# Altium PCB PCB1.PcbDoc (part 4 of 4)
Units mm, origin at the board's own origin, x right, y up, seen from the top; angles counter-clockwise.
Board outline 159.38 x 83.25 mm, 8 copper layers (Top Layer 1, GND, Signal 1, Signal 2, Power, Signal 3, Signal 4, Bottom Layer), stack 1.998 mm thick; 345 components, 291 nets, 1244 pads, 614 vias.
Unrouted connection lines stored in the file: 12.
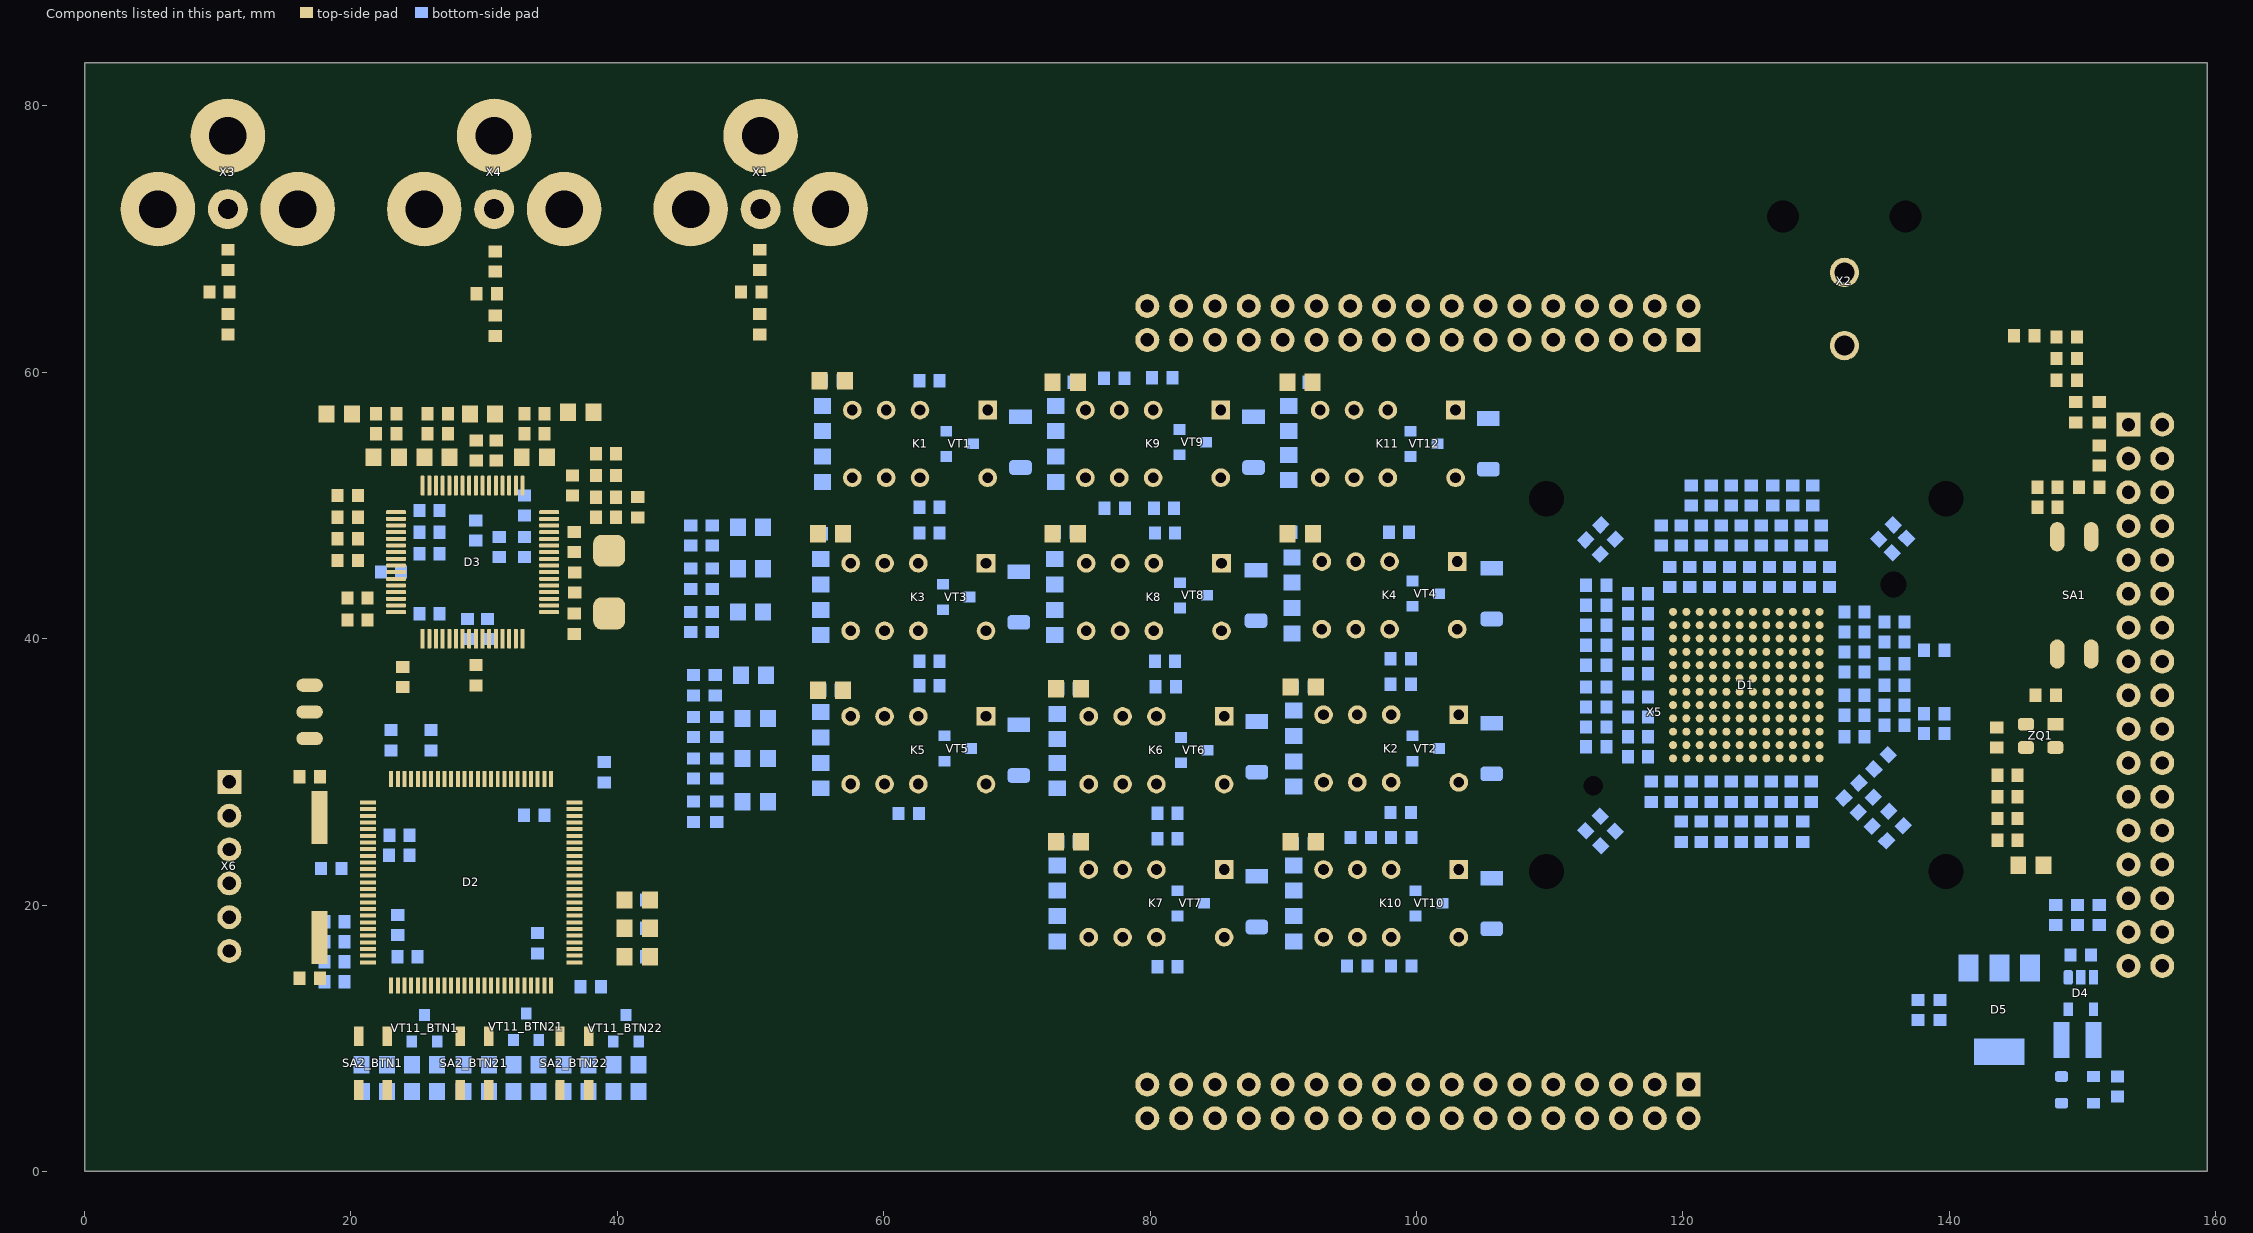
[diagram p10: the components of this part, seen from the top]

## Polygon pours and split planes (outlines as drawn) (continued)
+1.8V_VADD on Power "NONET_L-01_P-001" (solid, remove dead copper, pour order 15): 47.25,47.75 42.625,47.75 39,51.375 31.875,51.375 30.703,50.203 30.703,48.953 30.125,48.375 28.875,48.375 28.375,48.875 28.375,52.25 29.32,53.195 45.68,53.195 48,50.875 48,48.5
GND on Top Layer 1 "NONET_L-01_P-001" (solid, remove dead copper, pour order 31): 1,82.25 1,1 158.375,1 158.375,82.25
GND on GND "NONET_L-01_P-001" (solid, remove dead copper, pour order 32): 1,82.254 1,1 158.375,1 158.375,82.254

## Other copper
Top Layer 1:
  pour cut-out: 39.5,23.533 40.967,23.533 41.25,23.25
  pour cut-out: 29.018,31.176 27.926,31.176 27.375,30.625
  pour cut-out: 30.719,32.877 29.018,31.176 29.018,30.75
  pour cut-out: 144.425,23.8 144.425,22.2 147.825,22.2 147.825,23.8 146.898,23.8
  pour cut-out: 135.806,42.582 134.25,42.582 134.25,43.409
  pour cut-out: 135.806,45.546 134.25,45.546 134.25,44.469
  pour cut-out: 31.141,27.829 32.018,27.829 32.018,28.107
  pour cut-out: 30.733,28.237 30.733,28.852 31.018,28.852
  pour cut-out: 144.265,62.1 144.265,63.406 147.394,63.406 147.394,62.094
  pour cut-out: 155.986,54.641 151.25,54.641 151.25,53.75
  pour cut-out: 150.594,55.584 150.594,50.992 153.446,50.992
  pour cut-out: 154.593,48.579 154.593,50.992 153.446,50.992
  pour cut-out: 155.986,49.883 153.446,49.883 153.446,50.992
  pour cut-out: 157.095,53.532 157.095,50.992 155.986,50.992
  pour cut-out: 147.535,52.025 153.446,52.025 153.446,49.225 147.535,49.225
  pour cut-out: 139.721,10.162 139.721,9.411 139.313,9.411
  pour cut-out: 138.905,10.162 138.905,9.411 139.313,9.411
  pour cut-out: 138.057,10.181 138.057,9.382 137.649,9.382
  pour cut-out: 137.241,10.181 137.241,9.382 137.649,9.382
  pour cut-out: 141.125,11.842 146.75,11.842 146.75,12.658
  pour cut-out: 141.125,12.658 146.75,12.658 146.75,12.25
  pour cut-out: 113.158,30.625 113.158,29.875 112.875,29.875
  pour cut-out: 112.342,30.625 112.342,29.625 112.625,29.625
  pour cut-out: 126.283,23.614 126.283,22.875 125.875,22.875
  pour cut-out: 125.467,23.614 125.467,22.875 125.875,22.875
  pour cut-out: 124.783,23.619 124.783,22.875 124.375,22.875
  pour cut-out: 123.967,23.619 123.967,22.875 124.375,22.875
  pour cut-out: 123.283,23.625 123.283,22.875 122.875,22.875
  pour cut-out: 122.467,23.625 122.467,22.875 122.875,22.875
  pour cut-out: 137.464,28.462 136.823,28.462 136.823,27.821
  pour cut-out: 136.246,28.398 136.887,28.398 136.887,29.038
  pour cut-out: 134.043,32.625 134.043,31.817 133.56,31.817
  pour cut-out: 133.227,32.625 133.227,31.817 133.56,31.817
  pour cut-out: 137.043,35 137.043,35.75 136.623,35.75
  pour cut-out: 136.227,35 136.227,35.75 136.623,35.75
  pour cut-out: 135.523,36.5 135.523,35 135.115,35
  pour cut-out: 134.707,36.5 134.707,35 135.115,35
  pour cut-out: 133.635,42.408 134.25,42.408 134.25,42.251
  pour cut-out: 133.227,42 133.227,40.5 133.635,40.5
  pour cut-out: 99.978,26.951 99.978,25.072 99.615,25.072
  pour cut-out: 28.408,12.75 28.408,13.352 28.168,13.352
  pour cut-out: 28.408,12.75 28.408,11.625 28.053,11.625
  pour cut-out: 26.018,31.015 27.375,31.015 27.375,30.625
  pour cut-out: 22.75,26.842 21.868,26.842 21.868,27.052
  pour cut-out: 22.75,27.658 21.624,27.658 21.624,27.352
  pour cut-out: 18.401,24.75 18.401,19.717 16.901,19.717
  pour cut-out: 16.901,24.824 16.901,19.717 18.401,19.717
  pour cut-out: 19.122,18.75 19.122,14.25 19.53,14.25
  pour cut-out: 22.018,18.502 19.53,18.502 19.53,18.169
  pour cut-out: 27,22.283 22.57,22.283 22.57,21.875
  pour cut-out: 22.908,22.75 22.908,21.875 22.57,21.875
  pour cut-out: 33.816,30.202 37.299,30.202 37.299,29.934
  pour cut-out: 44.408,31 44.408,31.625 44.102,31.625
  pour cut-out: 41,30.592 44,30.592 44,31
  pour cut-out: 40.592,31 40.592,31.625 40.873,31.625
  pour cut-out: 41.7,21.175 43.2,21.175 43.2,15.325 41.7,15.325
  pour cut-out: 38.408,15.25 38.408,18.226 38.226,18.226
  pour cut-out: 36.36,13.952 36.36,15.402 36.018,15.402
  pour cut-out: 34.718,14.702 34.718,15.402 36.018,15.402
  pour cut-out: 34.324,14.881 34.75,14.881 34.75,15.125
  pour cut-out: 35.839,27.008 35.839,27.5 35.625,27.5
  pour cut-out: 38.283,28.375 38.283,30.436 37.686,30.436
  pour cut-out: 36.339,27.402 35.303,27.402 35.303,27.621
  pour cut-out: 32.875,31.033 34.5,31.033 34.5,30.625
  pour cut-out: 27.783,31.375 27.783,29.816 27.368,29.816
  pour cut-out: 26.018,31.015 24.75,31.015 24.75,30.828
  pour cut-out: 25.158,32 25.158,30.052 24.518,30.052
  pour cut-out: 41.217,37.75 41.217,39.5 41.934,39.5
  pour cut-out: 44.408,38.75 44.408,39.5 44.083,39.5
  pour cut-out: 44.877,37.156 44.408,37.156 44.408,38.75
  pour cut-out: 42.406,36.623 44.5,36.623 44.5,37
  pour cut-out: 41.625,37.342 41.842,37.342 41.842,37
  pour cut-out: 41.342,38.75 41.342,37.75 41.217,37.75
  pour cut-out: 41.342,38.75 41.342,39.5 41.535,39.5
  pour cut-out: 43.408,45 43.408,46.75 43,46.75
  pour cut-out: 42.592,46.75 42.592,45 43,45
  pour cut-out: 23.225,38.485 24.525,38.485 24.525,35.765 23.225,35.765
  pour cut-out: 35.286,50.128 35.286,49.644 35.141,49.644
  pour cut-out: 35.255,50.284 35.255,51.745 34.87,51.745
  pour cut-out: 36.375,49.431 35.606,49.431 35.606,49.122
  pour cut-out: 19.13,43.703 21.85,43.703 21.85,40.752
  pour cut-out: 19.13,43.703 19.13,40.752 21.85,40.752
  pour cut-out: 24.141,49.781 25.074,49.781 25.074,51.24
  pour cut-out: 33.125,51.625 34.3,51.625 34.3,51.175
  pour cut-out: 35.553,41.69 36.625,41.69 36.625,42
  pour cut-out: 31.666,37.284 31.666,38.337 30.587,38.337
  pour cut-out: 32.658,37 32.658,37.625 32.5,37.625
  pour cut-out: 30.467,38.625 30.467,39.478 30.728,39.478
  pour cut-out: 30.035,35.89 30.035,38.46 28.885,38.46
  pour cut-out: 28.735,35.89 28.735,39.319 29.682,39.319
  pour cut-out: 28.953,39.09 26.878,39.09 26.878,39.994
  pour cut-out: 25.074,40.669 25.074,41.75 25.25,41.75
  pour cut-out: 24.053,41.69 25.125,41.69 25.125,41.875
  pour cut-out: 26.506,40.722 26.115,40.722 26.115,40.831
  pour cut-out: 29.748,40.744 30.072,40.744 30.072,41.116
  pour cut-out: 34.115,45.707 34.115,45.3 33.851,45.3
  pour cut-out: 32.491,50.653 31.953,50.653 31.953,50.59
  pour cut-out: 25.125,45.967 25.72,45.967 25.72,46.033
  pour cut-out: 25.125,45.967 24.053,45.967 24.053,46.144
  pour cut-out: 22.628,45.589 22.628,45.25 22.375,45.25
  pour cut-out: 20.842,44.25 20.842,43.053 21.25,43.053
  pour cut-out: 20.842,44.25 20.842,45.75 21.125,45.75
  pour cut-out: 20.631,45.225 22.25,45.225 22.25,45.97
  pour cut-out: 18.39,51.4 18.39,45.225 21.11,45.225 21.11,51.4
  pour cut-out: 22.703,49.798 21.875,49.798 21.875,49.389
  pour cut-out: 34.878,50.536 33.375,50.536 33.375,50.25
  pour cut-out: 31.803,50.59 31.228,50.59 31.228,50.819
  pour cut-out: 33.974,43.919 33.974,44.844 34.203,44.844
  pour cut-out: 36.11,41.285 36.11,43.79 37.41,43.79 37.41,41.285
  pour cut-out: 35.782,43.419 35.782,41.994 34.878,41.994
  pour cut-out: 37.44,44.662 37.44,43.464 36.79,43.464
  pour cut-out: 36.14,42.864 36.14,44.984 36.79,44.984
  pour cut-out: 36.11,47.09 36.11,44.984 36.79,44.984
  pour cut-out: 35.553,45.298 36.79,45.298 36.79,44.984
  pour cut-out: 35.782,48.069 35.782,45.994 34.878,45.994
  pour cut-out: 35.782,49.569 35.782,48.494 35.002,48.494
  pour cut-out: 35.975,52.86 38.625,52.86 38.625,51.66 35.975,51.66
  pour cut-out: 40.505,48.475 42.169,48.475 42.169,51.235
  pour cut-out: 37.785,53.225 40.505,53.225 40.505,48.475 37.785,48.475
  pour cut-out: 37.785,54.525 40.505,54.525 40.505,53.225 37.785,53.225
  pour cut-out: 50.044,69.8 51.344,69.8 51.344,62.254 50.044,62.254
  pour cut-out: 30.176,69.673 31.476,69.673 31.476,62.127 30.176,62.127
  pour cut-out: 38.95,57.8 33.93,57.8 33.93,56.2 38.95,56.2
  pour cut-out: 33.57,52.818 33.57,57.525 32.41,57.525 32.41,53.75 32.375,53.75
  pour cut-out: 29.953,50.59 30.378,50.59 30.378,51.494
  pour cut-out: 28.303,50.59 28.728,50.59 28.728,51.262
  pour cut-out: 26.342,49.625 26.342,51.2 27.028,51.2
  pour cut-out: 25.453,50.59 27.228,50.59 27.228,51.244
  pour cut-out: 26.303,52.398 29.803,52.398 29.803,52.244
  pour cut-out: 28.745,53.965 31.545,53.965 31.545,52.381 28.715,52.381
  pour cut-out: 27.88,57.675 31.575,57.675 31.575,56.075 26.261,56.075 26.261,56.225
  pour cut-out: 22.851,57.675 27.88,57.675 27.88,56.225 26.261,56.225 26.261,52.818 22.851,52.818
  pour cut-out: 24.351,52.818 24.351,57.675 22.851,57.675 22.851,52.818
  pour cut-out: 17.425,57.675 17.425,56.225 24.005,56.225 24.005,57.675 20.825,57.675
  pour cut-out: 10.11,67.08 10.11,62.254 11.41,62.254 11.41,67.08
  pour cut-out: 10.11,69.8 10.11,67.08 11.41,67.08 11.41,69.8
  pour cut-out: 118,43.25 118,29.875 131.375,29.875 131.375,43.25
Signal 2:
  pour cut-out: 124.033,29.26 124.033,27.74 123.625,27.74
  pour cut-out: 124.033,29.26 124.033,30.25 123.25,30.25
  pour cut-out: 124.25,29.842 123.25,29.842 123.25,30.25
  pour cut-out: 124.25,30.658 123.25,30.658 123.25,30.25
  pour cut-out: 123.759,38.926 123.2,38.926 123.2,38.719
  pour cut-out: 126.349,39.514 126.349,38.922 125.762,38.922
  pour cut-out: 126.348,41.51 126.348,39.514 126.757,39.514
  pour cut-out: 126.348,41.51 126.348,42.625 126.756,42.625
  pour cut-out: 125.758,42.217 126.756,42.217 126.756,42.625
  pour cut-out: 126.123,43.709 126.123,42.625 126.756,42.625
  pour cut-out: 125.758,43.033 126.756,43.033 126.756,42.625
  pour cut-out: 124.033,43.875 124.033,42.625 123.75,42.625
  pour cut-out: 124.033,45.375 124.033,47 123.5,47
  pour cut-out: 124.033,43.875 124.033,45.375 123.625,45.375
  pour cut-out: 126.092,43.865 126.092,45.385 126.5,45.385
  pour cut-out: 126.092,45.385 126.092,46.5 126.75,46.5
  pour cut-out: 124.375,46.582 122.875,46.582 122.875,46.99
  pour cut-out: 124.375,47.398 122.875,47.398 122.875,46.99
  pour cut-out: 125.875,47.398 127.375,47.398 127.375,46.99
  pour cut-out: 128.76,50.5 128.76,50.398 128.25,50.398
  pour cut-out: 121.615,50.5 121.615,50.398 122.125,50.398
Power:
  pour cut-out: 39.25,26.908 40,26.908 40,26.5
  pour cut-out: 39.25,26.092 40,26.092 40,26.5
  pour cut-out: 136.12,46.463 136.12,47.375 135.75,47.375
  pour cut-out: 135.305,46.463 135.305,47.375 135.625,47.375
  pour cut-out: 130.375,46.582 118.375,46.582 118.375,46.99
  pour cut-out: 136.823,27.821 136.823,28.462 137.464,28.462
  pour cut-out: 136.246,28.398 136.887,28.398 136.887,29.038
  pour cut-out: 126.283,23.614 126.283,22.875 125.875,22.875
  pour cut-out: 125.467,23.614 125.467,22.875 125.875,22.875
  pour cut-out: 124.783,23.619 124.783,22.875 124.375,22.875
  pour cut-out: 123.967,23.619 123.967,22.875 124.375,22.875
  pour cut-out: 123.283,23.625 123.283,22.875 122.875,22.875
  pour cut-out: 122.467,23.625 122.467,22.875 122.875,22.875
  pour cut-out: 117.385,42.967 116.625,42.967 116.625,43.375
  pour cut-out: 117.385,43.783 116.625,43.783 116.625,43.625
  pour cut-out: 38.644,21.856 38.163,21.856 38.163,21.337
  pour cut-out: 37.587,21.913 38.067,21.913 38.067,22.433
  pour cut-out: 34.663,20.462 34.663,20.873 35.531,20.873
  pour cut-out: 33.967,20.75 33.967,21.625 34.125,21.625
  pour cut-out: 31.288,18.462 30.877,18.462 30.877,17.844
  pour cut-out: 30.212,18.288 30.623,18.288 30.623,18.906
  pour cut-out: 27.158,17.25 27.158,16.75 27,16.75
  pour cut-out: 26.342,17.25 26.342,16.875 26.625,16.875
  pour cut-out: 28.592,17.375 28.592,16.75 29,16.75
  pour cut-out: 30,17.408 29.125,17.408 29.125,17.125
  pour cut-out: 35.983,18.325 35.49,18.325 35.49,17.914
  pour cut-out: 34.914,18.49 35.539,18.49 35.539,18.99
  pour cut-out: 38,17.533 39.125,17.533 39.125,17.375
  pour cut-out: 32.926,16.107 32.926,16.625 32.625,16.625
  pour cut-out: 31.806,14.819 31.806,15.819 32.806,15.819
  pour cut-out: 31.11,15.107 31.11,16.625 31.625,16.625
  pour cut-out: 23.27,21.863 23.27,21.5 23.5,21.5
  pour cut-out: 24.082,22.267 23.678,22.267 23.678,21.863
  pour cut-out: 27.783,31.375 27.783,30.625 27.375,30.625
  pour cut-out: 26.967,31.375 26.967,30.625 27.375,30.625
  pour cut-out: 33.283,22.625 33.283,22.125 33.125,22.125
  pour cut-out: 32.467,22.625 32.467,22.125 32.75,22.125
  pour cut-out: 37.342,24.125 37.342,23.25 37.625,23.25
  pour cut-out: 37.75,24.533 38.5,24.533 38.5,24.375
  pour cut-out: 32.531,42.623 31.913,42.623 31.913,42.212
  pour cut-out: 31.469,42.877 32.219,42.877 32.219,43.377
  pour cut-out: 31.908,45.25 31.908,44.875 31.75,44.875
  pour cut-out: 31.092,45.25 31.092,44.875 31.375,44.875
  pour cut-out: 33.408,47.625 33.408,48.25 33.125,48.25
  pour cut-out: 32.592,47.625 32.592,48.125 32.75,48.125
  pour cut-out: 28.283,47.375 28.283,48.25 28,48.25
  pour cut-out: 27.467,47.375 27.467,48.25 27.875,48.25
  pour cut-out: 25.533,46.375 25.402,46.375 25.402,45.494
  pour cut-out: 24.617,45.65 24.748,45.65 24.748,46.531
GND:
  pour cut-out: 140.75,6.092 135.75,6.092 135.75,6.5
  pour cut-out: 135.75,6.908 140.75,6.908 140.75,6.5
  pour cut-out: 139.721,10.162 139.721,9.411 139.313,9.411
  pour cut-out: 138.905,10.162 138.905,9.411 139.313,9.411
  pour cut-out: 138.057,10.181 138.057,9.382 137.649,9.382
  pour cut-out: 137.241,10.181 137.241,9.382 137.649,9.382
  pour cut-out: 113.158,30.625 113.158,29.875 113,29.875
  pour cut-out: 112.342,30.625 112.342,29.625 112.5,29.625
  pour cut-out: 147.913,55.832 144.885,55.832 144.885,56.24
  pour cut-out: 144.885,56.648 147.913,56.648 147.913,56.24
  pour cut-out: 146.497,58.997 144.711,58.997 144.711,59.404
  pour cut-out: 144.711,59.812 146.497,59.812 146.497,59.404
  pour cut-out: 151.033,46.375 151.033,44 150.625,44
  pour cut-out: 150.217,46.375 150.217,44 150.625,44
  pour cut-out: 137.464,28.462 136.823,28.462 136.823,27.821
  pour cut-out: 136.246,28.398 136.887,28.398 136.887,29.038
  pour cut-out: 126.283,23.614 126.283,22.875 125.875,22.875
  pour cut-out: 125.467,23.614 125.467,22.875 125.875,22.875
  pour cut-out: 124.783,23.619 124.783,22.875 124.375,22.875
  pour cut-out: 123.967,23.619 123.967,22.875 124.375,22.875
  pour cut-out: 123.283,23.625 123.283,22.875 122.875,22.875
  pour cut-out: 122.467,23.625 122.467,22.875 122.875,22.875
  pour cut-out: 31.288,18.462 30.788,18.462 30.788,17.712
  pour cut-out: 30.212,18.288 30.623,18.288 30.623,18.906
  pour cut-out: 32.806,15.819 31.674,15.819 31.674,14.73
  pour cut-out: 31.23,15.395 32.23,15.395 32.23,16.395
  pour cut-out: 38.408,17.125 38.408,15.25 38,15.25
  pour cut-out: 37.592,17.125 37.592,15.25 38,15.25
  pour cut-out: 44,30.592 41,30.592 41,31
  pour cut-out: 41,31.408 44,31.408 44,31
  pour cut-out: 27.156,22.283 22.5,22.283 22.5,23.158
  pour cut-out: 22.57,21.467 27,21.467 27,22.283
  pour cut-out: 22.092,22.75 22.092,21.467 22.57,21.467
  pour cut-out: 43.408,46.75 43.408,45 43,45
  pour cut-out: 42.592,46.75 42.592,45 43,45
  pour cut-out: 44.908,37 44.377,37 44.377,38.906
  pour cut-out: 42.25,36.592 44.5,36.592 44.5,37
  pour cut-out: 41.217,37.75 41.962,37.75 41.962,36.712
  pour cut-out: 41.342,38.75 41.342,37.75 41.217,37.75
  pour cut-out: 41.75,39.158 44,39.158 44,38.75
  pour cut-out: 33.5,42.033 32.663,42.033 32.663,43.288
  pour cut-out: 31.625,41.217 33.5,41.217 33.5,41.625
  pour cut-out: 31.217,42.5 31.217,41.625 31.625,41.625
  pour cut-out: 31.469,42.877 32.219,42.877 32.219,43.377
  pour cut-out: 27.033,43.875 27.033,43.125 26.625,43.125
  pour cut-out: 26.217,43.875 26.217,43.125 26.625,43.125
  pour cut-out: 31.908,45.25 31.908,44.5 31.5,44.5
  pour cut-out: 31.092,45.25 31.092,44.5 31.5,44.5
  pour cut-out: 33,48.842 32.125,48.842 32.125,49.25
  pour cut-out: 32.125,50.283 32.125,49.658 33,49.658
  pour cut-out: 31.717,49.875 31.717,49.25 32.125,49.25
  pour cut-out: 29.783,50.317 29.783,48.885 29.375,48.885
  pour cut-out: 28.967,50.317 28.967,48.885 29.375,48.885
  pour cut-out: 28.283,49.125 28.283,47.375 27.875,47.375
  pour cut-out: 27.467,49.125 27.467,47.375 27.875,47.375
Bottom Layer:
  pour cut-out: 122.25,35.875 128.624,35.875 128.624,35.125 122,35.125
  pour cut-out: 122.375,34.875 128.257,34.875 128.257,34.075 122.183,34.075
  pour cut-out: 122.5,30.625 127.031,30.625 127.031,29.71 122.625,29.71
  pour cut-out: 35.985,25.875 35.985,26.702 35.577,26.702
  pour cut-out: 30.853,27.949 30.853,28.5 30.375,28.5
  pour cut-out: 31.43,28.525 31,28.525 31,29
  pour cut-out: 151.033,46.375 151.033,44 150.625,44
  pour cut-out: 150.217,46.375 150.217,44 150.625,44
  pour cut-out: 147.913,55.832 144.885,55.832 144.885,56.24
  pour cut-out: 144.885,56.648 147.913,56.648 147.913,56.24
  pour cut-out: 146.497,58.997 144.711,58.997 144.711,59.404
  pour cut-out: 144.711,59.812 146.497,59.812 146.497,59.404
  pour cut-out: 46.5,41.125 48.625,41.125 48.625,39.75 46.5,39.75
  pour cut-out: 66.892,52.085 66.892,54.625 67.672,54.625
  pour cut-out: 146.75,8.431 145.65,8.431 145.65,8.206
  pour cut-out: 142.319,16.529 142.319,18.125 142.75,18.125
  pour cut-out: 146.75,10.819 147.825,10.819 147.825,11.071
  pour cut-out: 149.561,13.771 149.561,12.75 148.875,12.75
  pour cut-out: 148.375,12.875 151.375,12.875 151.375,12.229
  pour cut-out: 147.431,12.625 147.431,13.25 147.125,13.25
  pour cut-out: 153.446,14.323 151.175,14.323 151.175,14.575
  pour cut-out: 155.986,14.323 153.446,14.323 153.446,15.432
  pour cut-out: 157.095,15.432 157.095,16.625 156.625,16.625
  pour cut-out: 147.572,20.714 146.25,20.714 146.25,20.43
  pour cut-out: 152.337,20.512 152.337,19.375 153.125,19.375
  pour cut-out: 157.095,20.512 157.095,19.375 156.375,19.375
  pour cut-out: 153.446,21.621 155.986,21.621 155.986,20.512
  pour cut-out: 142.283,27.383 142.283,20.75 141.25,20.75
  pour cut-out: 116.925,29.91 116.925,31.263 117.473,31.263
  pour cut-out: 131.465,35.926 131.465,37.5 132.115,37.5
  pour cut-out: 136.407,30.208 135.412,30.208 135.412,31.287
  pour cut-out: 137.608,29.183 136.407,29.183 136.407,30.208
  pour cut-out: 137.492,25.998 136.39,25.998 136.39,27.1
  pour cut-out: 135.252,23.883 135.252,25.998 137.492,25.998
  pour cut-out: 135.252,23.883 135.252,24.985 134.15,24.985
  pour cut-out: 131.105,24.905 132.155,24.905 132.155,23.855
  pour cut-out: 131.133,28.002 132.235,28.002 132.235,26.9
  pour cut-out: 113.752,27.617 115.867,25.502 114.948,24.583 112.833,26.698
  pour cut-out: 129,23.041 125.875,23.041 125.875,23.614
  pour cut-out: 122.875,22.263 125.875,22.263 125.875,22.875
  pour cut-out: 129.7,24.09 129.7,27.74 128.125,27.74
  pour cut-out: 119.175,25.5 119.175,27.75 120.375,27.75
  pour cut-out: 119.175,26.91 119.175,24.09 120.516,24.09
  pour cut-out: 112.833,46.302 114.948,48.417 115.867,47.498 113.752,45.383
  pour cut-out: 122.175,26.91 122.175,24.09 129.7,24.09 129.7,26.91
  pour cut-out: 116.925,29.91 116.925,27.09 130.375,27.09 130.375,29.75
  pour cut-out: 112.577,32.875 114.26,32.875 114.26,31.875
  pour cut-out: 114.492,28.964 114.492,31.375 113.96,31.375
  pour cut-out: 112.02,28.964 112.02,31.375 112.74,31.375
  pour cut-out: 138.75,35 136.5,35 136.5,33.75
  pour cut-out: 137.465,39.825 140.285,39.825 140.285,38.425 137.465,38.425
  pour cut-out: 134.465,41.95 137.285,41.95 137.285,37 134.5,37
  pour cut-out: 131.7,42.7 134.285,42.7 134.285,36.8 131.465,36.8
  pour cut-out: 137.288,44.064 137.288,47.5 136.5,47.5
  pour cut-out: 134.324,44.064 134.324,47.5 135.125,47.5
  pour cut-out: 133.758,47.498 135.752,49.492 137.742,47.502 135.752,45.512
  pour cut-out: 131.7,43.62 131.7,42.25 130.706,42.25
  pour cut-out: 130.467,42.625 130.467,43.865 131,43.865
  pour cut-out: 130.467,39.517 130.467,42.625 130.867,42.625
  pour cut-out: 130.467,39.517 130.467,38.511 130.875,38.511
  pour cut-out: 129.761,38.919 130.875,38.919 130.875,38.511
  pour cut-out: 129.349,37.518 129.349,38.511 129.761,38.511
  pour cut-out: 136.367,31.252 132.052,27.083 131.133,28.002 134.228,31.093 135.377,32.242
  pour cut-out: 130.776,31.22 130,31.22 130,31.625
  pour cut-out: 130.325,29.91 130.325,31.92 129.757,31.92
  pour cut-out: 129.349,32.518 129.349,33.515 129.757,33.515
  pour cut-out: 130.875,33.108 132.115,33.108 132.115,33.75
  pour cut-out: 119.761,33.108 130.875,33.108 130.875,33.515
  pour cut-out: 119.353,35.518 119.353,33.515 119.761,33.515
  pour cut-out: 132.765,36.45 132.765,31.5 131.24,31.5
  pour cut-out: 119.761,35.926 132.115,35.926 132.115,35.7
  pour cut-out: 129.349,32.518 129.349,31.512 129.757,31.512
  pour cut-out: 128.761,31.92 129.757,31.92 129.757,31.512
  pour cut-out: 128.354,31.512 128.354,30.448 128.761,30.448
  pour cut-out: 122.25,30.658 128.761,30.658 128.761,30.448
  pour cut-out: 122.25,30.658 120.766,30.658 120.766,30.442
  pour cut-out: 119.761,30.849 120.766,30.849 120.766,30.442
  pour cut-out: 119.761,30.849 118.625,30.849 118.625,30.442
  pour cut-out: 119.033,35.518 119.033,30.442 118.625,30.442
  pour cut-out: 118.625,35.926 117.835,35.926 117.835,35.625
  pour cut-out: 122.155,44.935 122.155,44.315 122.5,44.315
  pour cut-out: 116.735,44.075 119,44.075 119,43.865
  pour cut-out: 118.625,37.107 117.835,37.107 117.835,37.375
  pour cut-out: 119.033,41.51 119.033,37.515 118.625,37.515
  pour cut-out: 119.033,41.51 119.033,42.625 118.625,42.625
  pour cut-out: 119.895,42.217 118.625,42.217 118.625,42.625
  pour cut-out: 123.158,42.625 123.158,43.415 122.5,43.415
  pour cut-out: 119.625,42.217 122.75,42.217 122.75,42.625
  pour cut-out: 122.859,46.035 122.859,43.215 131.7,43.215 131.7,46.035
  pour cut-out: 126.75,53.362 129.75,53.362 129.75,52.75
  pour cut-out: 125.252,52.214 126.75,52.214 126.75,51.676
  pour cut-out: 130.45,52.16 130.45,48.51 124.625,48.51 124.625,51.06
  pour cut-out: 119.925,52.16 119.925,48.51 124.939,48.51 124.939,51.06
  pour cut-out: 120.625,53.362 123.625,53.362 123.625,52.75
  pour cut-out: 121.526,63.532 121.526,59.5 120.5,59.5
  pour cut-out: 117.886,63.541 120.426,63.541 120.426,62.432
  pour cut-out: 95.026,63.541 117.886,63.541 117.886,62.432
  pour cut-out: 93.917,62.432 93.917,60.375 94.125,60.375
  pour cut-out: 97.845,56.257 97,56.257 97,56.625
  pour cut-out: 98.753,57.165 98.753,58.375 98.25,58.375
  pour cut-out: 101.626,55.974 101.626,54.875 102.125,54.875
  pour cut-out: 101.626,57.901 101.626,58.375 101.875,58.375
  pour cut-out: 102.017,52.085 102.017,54.625 102.906,54.625
  pour cut-out: 84.451,40.583 84.451,43.25 85.329,43.25
  pour cut-out: 101.819,45.125 101.819,43.377 102.586,43.377
  pour cut-out: 102.142,40.71 102.142,43.377 103.03,43.377
  pour cut-out: 101.939,33.38 101.939,31.75 102.403,31.75
  pour cut-out: 102.267,29.21 102.267,31.75 102.897,31.75
  pour cut-out: 84.642,29.085 84.642,31.375 85.75,31.375
  pour cut-out: 84.642,17.585 84.642,20.125 85.505,20.125
  pour cut-out: 102.267,17.585 102.267,20 103.25,20
  pour cut-out: 94.143,14.72 100.265,14.72 100.265,16.12 94.792,16.12
  pour cut-out: 101.603,21.591 101.603,20.525 101.785,20.525
  pour cut-out: 91.629,18.37 89.929,18.37 89.929,25.325 91.629,25.325 91.629,23.78
  pour cut-out: 94.397,25.772 94.397,24.372 100.265,24.372 100.265,25.772
  pour cut-out: 97.4,26.251 97.4,27.651 100.22,27.651 100.22,26.251
  pour cut-out: 91.629,29.995 89.929,29.995 89.929,37.075 91.629,37.075 91.629,35.405
  pour cut-out: 97.4,37.797 97.4,39.197 100.22,39.197 100.22,37.797
  pour cut-out: 97.4,37.276 97.4,35.876 100.22,35.876 100.22,37.276
  pour cut-out: 97.275,48.697 97.275,47.297 100.095,47.297 100.095,48.697
  pour cut-out: 91.504,41.495 89.804,41.495 89.804,48.7 91.504,48.7 91.504,46.905
  pour cut-out: 92.892,58.111 93.75,58.111 93.75,57.75
  pour cut-out: 92.892,56.219 93.625,56.219 93.625,56.625
  pour cut-out: 91.252,52.997 89.552,52.997 89.552,59.95 91.252,59.95 91.252,58.28
  pour cut-out: 84.392,52.085 84.392,54.625 85.25,54.625
  pour cut-out: 84.841,54.191 82.875,54.191 82.875,54.875
  pour cut-out: 84.841,55.352 82.875,55.352 82.875,54.875
  pour cut-out: 79.495,60.278 79.495,58.878 82.315,58.878 82.315,60.278
  pour cut-out: 73.754,52.87 72.054,52.87 72.054,59.95 73.754,59.95 73.754,58.28
  pour cut-out: 79.622,49.099 82.442,49.099 82.442,50.499 79.622,50.499
  pour cut-out: 79.705,48.633 79.705,47.233 82.525,47.233 82.525,48.633
  pour cut-out: 79.705,37.608 79.705,39.008 82.525,39.008 82.525,37.608
  pour cut-out: 79.767,37.095 79.767,35.695 82.587,35.695 82.587,37.095
  pour cut-out: 79.892,27.595 79.892,26.195 82.712,26.195 82.712,27.595
  pour cut-out: 79.894,25.684 79.894,24.284 82.714,24.284 82.714,25.684
  pour cut-out: 64.705,52.558 62.72,52.558 62.72,52.085
  pour cut-out: 62.017,60.069 62.017,58.669 64.837,58.669 64.837,60.069
  pour cut-out: 56.254,52.87 54.554,52.87 54.554,60.075 56.254,60.075 56.254,58.28
  pour cut-out: 82.714,16.059 79.894,16.059 79.894,14.683
  pour cut-out: 73.877,18.37 72.177,18.37 72.177,25.45 73.877,25.45 73.877,23.78
  pour cut-out: 73.877,29.87 72.177,29.87 72.177,36.95 73.877,36.95 73.877,35.153
  pour cut-out: 75.035,47.3 75.035,48.7 71.986,48.7
  pour cut-out: 73.686,41.368 71.986,41.368 71.986,48.7 73.686,48.7 73.686,46.778
  pour cut-out: 66.767,40.585 66.767,43.375 67.125,43.375
  pour cut-out: 62.017,50.569 64.837,50.569 64.837,49.169 62.017,49.169
  pour cut-out: 62.019,48.639 64.839,48.639 64.839,47.239 62.019,47.239
  pour cut-out: 57.535,47.75 56.435,47.75 56.435,47.175 57.535,47.175
  pour cut-out: 56.183,40.397 56.183,48.575 54.25,48.575 54.25,48.5
  pour cut-out: 55.152,39.416 54.306,39.416 54.306,38.75
  pour cut-out: 62.019,39.014 64.839,39.014 64.839,37.614 62.019,37.614
  pour cut-out: 66.767,29.085 66.767,31.625 67.625,31.625
  pour cut-out: 62.015,37.163 64.835,37.163 64.835,35.763 62.069,35.763
  pour cut-out: 60.465,27.575 63.285,27.575 63.285,26.175 60.465,26.175
  pour cut-out: 56.183,28.897 56.183,30.375 55.75,30.375
  pour cut-out: 56.129,29.87 56.129,36.375 55.375,36.375
  pour cut-out: 57.41,35.425 57.41,36.825 54,36.825 54,35.425 54.59,35.425
  pour cut-out: 22.8,15.425 24.2,15.425 24.2,18.39 22.8,18.39
  pour cut-out: 31.806,14.819 31.806,15.819 32.806,15.819
  pour cut-out: 31.23,15.395 32.23,15.395 32.23,16.395
  pour cut-out: 31.288,18.462 30.788,18.462 30.788,17.712
  pour cut-out: 30.212,18.288 30.712,18.288 30.712,19.038
  pour cut-out: 33.283,30.625 33.283,31.25 33.125,31.25
  pour cut-out: 32.875,30.217 32.25,30.217 32.25,30.375
  pour cut-out: 35.539,18.99 35.539,18.579 35.046,18.579
  pour cut-out: 35.358,17.825 35.358,18.414 36.115,18.414
  pour cut-out: 35.202,17.794 34.625,17.794 34.625,18
  pour cut-out: 42.785,15.425 38,15.425 38,16.125
  pour cut-out: 42.785,15.425 42.785,21.075 39.965,21.075
  pour cut-out: 37.592,17.125 37.592,15.25 38,15.25
  pour cut-out: 25.67,10.4 25.67,5.944 26.47,5.944
  pour cut-out: 25.67,10.4 27.27,10.4 27.27,7.396
  pour cut-out: 25.67,7.15 25.67,10.4 27.07,10.4
  pour cut-out: 33.295,10.525 33.295,6 34.095,6
  pour cut-out: 33.295,10.525 34.895,10.525 34.895,7.435
  pour cut-out: 33.295,7.15 33.295,10.525 34.695,10.525
  pour cut-out: 42.395,10.4 42.395,6.492 40.995,6.492
  pour cut-out: 40.795,7.318 40.795,6.25 41.483,6.25
  pour cut-out: 42.395,7.15 42.395,10.4 40.795,10.4
  pour cut-out: 40.795,8.85 40.795,10.4 42.195,10.4
  pour cut-out: 41.952,6.85 44.125,6.85 44.125,6.625
  pour cut-out: 38.202,6.85 41.595,6.85 41.595,6
  pour cut-out: 30.702,6.85 34.095,6.85 34.095,6
  pour cut-out: 25.297,6.85 26.47,6.85 26.47,5.944
  pour cut-out: 25.37,6.85 22.72,6.85 22.72,6
  pour cut-out: 25.67,8.85 27.25,8.85 27.25,6.25
  pour cut-out: 21.92,8.975 23.52,8.975 23.52,6.625 23.5,6.625
  pour cut-out: 20.18,19.45 20.18,13.55 17.757,13.55 17.757,19.45
  pour cut-out: 22.57,21.467 27,21.467 27,21.875
  pour cut-out: 22.163,21.875 22.163,22.75 22.5,22.75
  pour cut-out: 25.3,31.183 25.3,28.25 25.5,28.25
  pour cut-out: 26.7,32.265 26.7,31.783 27.375,31.783
  pour cut-out: 27.375,31.783 28.75,31.783 28.75,31.625
  pour cut-out: 26.967,31.375 26.967,30 27.25,30
  pour cut-out: 23.875,35.957 23.187,35.957 23.187,36.278
  pour cut-out: 24.283,36.365 24.283,36.956 23.865,36.956
  pour cut-out: 26.283,37.25 26.283,38.128 25.954,38.128
  pour cut-out: 25.875,36.842 24,36.842 24,37.719
  pour cut-out: 16.895,34.092 20.155,34.092 20.155,35.363
  pour cut-out: 18.99,46.283 22,46.283 22,46.25
  pour cut-out: 22.89,45.7 22.377,45.7 22.377,46.406
  pour cut-out: 24.485,42.575 27.305,42.575 27.305,41.175 24.485,41.175
  pour cut-out: 32.783,43 32.783,41.625 32.427,41.625
  pour cut-out: 31.469,42.877 32.087,42.877 32.087,43.288
  pour cut-out: 32.875,44.592 34.875,44.592 34.875,45.125
  pour cut-out: 32.467,45 32.467,46 32.875,46
  pour cut-out: 31.021,45.465 31.021,44.092 31.5,44.092
  pour cut-out: 31.908,44.5 31.908,45.25 31.5,45.25
  pour cut-out: 29.875,47.815 28.675,47.815 28.675,48.235
  pour cut-out: 31.862,47.82 32.765,47.82 32.765,48.868
  pour cut-out: 30.522,47.849 29.718,47.849 29.718,48.677
  pour cut-out: 28.875,47.501 27.875,47.501 27.875,48.25
  pour cut-out: 32.887,50.31 32.887,52.25 32.043,52.25
  pour cut-out: 32.887,50.31 32.887,49.54 32.52,49.54
  pour cut-out: 32.32,45.465 33.72,45.465 33.72,48.59 32.32,48.59
  pour cut-out: 31.717,49.875 31.717,49.25 32.125,49.25
  pour cut-out: 31.879,48.339 31.413,48.339 31.413,48.913
  pour cut-out: 30.371,48.339 30.837,48.339 30.837,48.913
  pour cut-out: 28.675,49.535 28.998,49.535 28.998,50.473
  pour cut-out: 29.783,50.317 29.783,49.535 30.075,49.535
  pour cut-out: 28.893,49.535 28.967,49.535 28.967,50.317
  pour cut-out: 27.875,46.967 27,46.967 27,47.125
  pour cut-out: 28.283,49.125 28.283,47.375 27.875,47.375
  pour cut-out: 27.875,49.533 27.105,49.533 27.105,49.125
  pour cut-out: 24.475,48.7 24.475,45.675 27.295,45.675
  pour cut-out: 26.005,50.325 27.295,50.325 27.295,45.675 25.995,45.675

## Silkscreen, mask and mechanical layers (free items; w line width, h text height)
Top Overlay:
  region: 107.256,59.014 106.25,60.02 105.082,60.02
  region: 107.256,59.014 106.25,60.02 106.25,61
  region: 145.375,40.187 145.375,41.625 146.75,41.625 146.75,40.187
  region: 14.5,26 12.239,26 12.155,30.595
  region: 14.5,20.25 12.155,20.435 12.155,15.355
  region: 78.442,7.782 78.442,5.242 119.056,5.242 119.056,7.782
  region: 152.189,44.58 152.189,42.04 154.729,42.04 154.729,44.58
  region: 152.189,54.74 152.189,49.66 157.269,49.66 157.269,54.74
  region: 121.716,63.642 121.716,66.182 98.856,66.182 98.856,63.642
  region: 81.076,63.679 81.076,61.102 121.716,61.102 121.716,63.642
  region: 60.794,20.934 60.794,20.487 62.291,19.836 63.369,20.349 63.369,20.637 62.094,21.244 62.094,21.92 62.047,21.945 62.045,20.984 61.92,20.921 61.92,21.419 61.795,21.365 61.795,20.872 61.669,20.823 61.669,21.311 61.544,21.257 61.544,20.775 61.419,20.725 61.419,21.203 61.294,21.151 61.294,20.681 61.169,20.631 61.169,21.094 61.044,21.044 61.044,20.567 60.919,20.521 60.919,20.988
  region: 60.66,20.444 60.66,21.446 62.031,21.959 60.635,22.415 59.285,21.858 59.285,20.986 59.41,20.94 59.41,21.551 59.535,21.494 59.535,20.901 59.659,20.847 59.659,21.438 59.777,21.385 59.777,20.794 59.907,20.739 59.907,21.326 60.026,21.272 60.026,20.697 60.155,20.641 60.155,21.214 60.281,21.157 60.281,20.596 60.406,20.542 60.406,21.1 60.535,21.042 60.535,20.501
  lines w0.15: 57.97,20.396 60.677,19.173 63.42,20.456 63.42,22.284 60.66,23.437 57.97,22.344 57.97,20.396
  lines w0.2: 99,67.625 121,67.625 ; 120.995,67.621 121.875,66.75 ; 145.375,38.75 146.75,38.75 146.75,41.625 145.375,41.625 145.375,38.75
  text "Wavescale video compression/decompression (CODEC)" at 59.269,77.333 h3
  text "ADDR3" at 96.045,72.027 h0.6 r315
  text "ADDR0" at 98.541,72.031 h0.6 r315
  text "nRD" at 101.166,72.031 h0.6 r315
  text "ADDR2" at 108.738,72.031 h0.6 r315
  text "nIRQ" at 111.238,72.031 h0.6 r315
  text "ADDR1" at 116.536,71.858 h0.6 r315
  text "nACK" at 106.904,71.24 h0.6 r315
  text "nWE" at 114.893,70.88 h0.6 r315
  text "nCS" at 105.044,70.527 h0.6 r315
  text "15" at 97.975,65.225 h0.6
  text "10" at 100.475,65.225 h0.6
  text "11" at 103.309,65.225 h0.6
  text "13" at 105.475,65.225 h0.6
  text "12" at 108.1,65.225 h0.6
  text "6" at 111.434,65.225 h0.6
  text "7" at 114.059,65.225 h0.6
  text "2" at 116.559,65.225 h0.6
  text "3" at 119.184,65.225 h0.6
  text "1" at 83.767,65.1 h0.6
  text "4" at 86.059,65.1 h0.6
  text "5" at 88.684,65.1 h0.6
  text "8" at 91.184,65.1 h0.6
  text "9" at 93.684,65.1 h0.6
  text "14" at 95.35,65.1 h0.6
  text "0" at 81.059,64.975 h0.6
  text "EXT_+3.3V" at 136.984,64.988 h2
  text "Cb" at 12.048,63.924 h5
  text "Cr" at 32.218,63.924 h5
  text "Y" at 52.121,63.924 h5
  text "HDATA" at 72.461,61.268 h2
  text "PULL-DOWN" at 92.725,58.275 h1.5
  text "nDREQ0/1" at 75.518,58.15 h1.5
  text "HDATA0/1" at 57.918,58.063 h1.5
  text "RELE1" at 54.26,52.358 h2 r90
  text "RELE9" at 71.729,51.985 h2 r90
  text "RELE11" at 89.479,51.795 h2 r90
  text "+1.8V_VADD" at 44.926,50.25 h0.6
  text "HDATA6/7" at 93.163,46.923 h1.5
  text "HDATA14/15" at 75.148,46.798 h1.5
  text "HDATA4/5" at 57.616,46.673 h1.5
  text "+1.8V_VDDPLL" at 43.451,45.75 h0.6
  text "+3.3V DEBUG" at 146.815,42.918 h1 r90
  text "+1.8V_VDD" at 43.176,42 h0.6
  text "ON" at 144.55,41.3 h0.6
  text "RELE4" at 89.479,40.549 h2 r90
  text "RELE3" at 54.104,40.488 h2 r90
  text "RELE8" at 71.729,40.423 h2 r90
  text "Use HDMI to YPbPr Component Viedo Converter 1080p HDMI" at 13.166,38.371 h3 r90
  text "OFF" at 144.3,37.175 h0.6
  text "+3.3V_VDDIO" at 45.001,37 h0.6
  text "HDATA10/11" at 75.661,35.298 h1.5
  text "HDATA2/3" at 93.29,35.298 h1.5
  text "HDATA8/9" at 57.741,35.173 h1.5
  text "SDA" at 9.978,34.809 h0.6
  text "SCL" at 17.675,33.55 h0.6
  text "+3.3V_VDD" at 38.176,31.625 h0.6
  text "GND" at 17.675,31.55 h0.6
  text "VCC" at 8.3,30.2 h0.6 r270
  text "RELE6" at 71.979,29.11 h2 r90
  text "RELE2" at 89.729,28.985 h2 r90
  text "RELE5" at 54.229,28.86 h2 r90
  text "GND" at 8.3,27.41 h0.6 r270
  text "PROG" at 12.239,26 h2 r270
  text "+3.3V_VDDA" at 41.951,25.75 h0.6
  text "TX" at 8.3,24.775 h0.6 r270
  text "HDATA12/13" at 75.274,23.798 h1.5
  text "nDACK0/1" at 93.393,23.775 h1.5
  text "RX" at 8.3,22.275 h0.6 r270
  text "SWC" at 8.3,20.075 h0.6 r270
  text "ERROR" at 43.298,19.37 h2
  text "RELE7" at 71.979,17.485 h2 r90
  text "SWD" at 8.3,17.45 h0.6 r270
  text "WRITE" at 43.298,17.12 h2
  text "RELE10" at 89.729,16.922 h2 r90
  text "READ" at 43.298,14.989 h2
  text "КУ4062" at 117.493,14.049 h5
  text "ООО«ГК«СНАБЖЕНИЕ» / Разработано в 2026 году" at 47.92,13.692 h1.5
  text "16" at 76.608,6.725 h0.6
  text "17" at 80.1,6.725 h0.6
  text "18" at 82.6,6.725 h0.6
  text "19" at 85.1,6.725 h0.6
  text "20" at 87.559,6.725 h0.6
  text "21" at 90.392,6.725 h0.6
  text "25" at 92.684,6.725 h0.6
  text "22" at 95.184,6.725 h0.6
  text "23" at 97.809,6.725 h0.6
  text "26" at 100.184,6.725 h0.6
  text "29" at 102.809,6.725 h0.6
  text "24" at 105.309,6.725 h0.6
  text "30" at 108.059,6.725 h0.6
  text "28" at 110.434,6.725 h0.6
  text "27" at 112.934,6.725 h0.6
  text "31" at 115.892,6.725 h0.6
  text "HDATA" at 72.358,5.364 h2
  text "STM_RESET" at 19.794,4.604 h1.5 r90
  text "DUT_RESET" at 34.919,4.604 h1.5 r90
  text "ADV_RESET" at 27.422,4.511 h1.5 r90
  text "ТО2176 / ADV212" at 133.713,2.786 h5
Bottom Overlay:
  text "ТО2176 / ADV212" at 157.311,73.383 h5
  text "VT11" at 23.225,9.3 h0.6
  text "VT11" at 30.85,9.3 h0.6
  text "VT11" at 38.45,9.3 h0.6
  text "Разработал инженер-разработчик отдела разработки Сергеев Д.А." at 2.681,8.938 h2 r270
  text "C75" at 23.536,3.552 h0.6
  text "R149" at 27.161,3.552 h0.6
  text "C75" at 38.7,3.55 h0.6
  text "R149" at 42.325,3.55 h0.6
  text "C75" at 31.232,3.512 h0.6
  text "R149" at 34.857,3.512 h0.6
  text "R147" at 23.536,2.677 h0.6
  text "R148" at 27.161,2.677 h0.6
  text "R147" at 38.7,2.675 h0.6
  text "R148" at 42.325,2.675 h0.6
  text "R147" at 31.232,2.637 h0.6
  text "R148" at 34.857,2.637 h0.6
Board:
  the board outline again, w0.2

## Dimensions
159.375,83.25 to 159.375,0 on Dimension
0,83.25 to 159.375,83.25 on Dimension

## Text inside footprints (layer, text, board x,y; h text height)
D1: Top Overlay "BGA144(13x13)" at 115.73,55.225 h4; Top Overlay "A1" at 118.243,43.514 h2
K1: Bottom Overlay "+" at 66.72,57.825 h0.6 r180; Bottom Overlay "-" at 66.57,52.515 h0.6 r180
K2: Bottom Overlay "-" at 101.945,29.64 h0.6 r180; Bottom Overlay "+" at 102.095,34.95 h0.6 r180
K3: Bottom Overlay "+" at 66.595,46.325 h0.6 r180; Bottom Overlay "-" at 66.445,41.015 h0.6 r180
K4: Bottom Overlay "+" at 101.97,46.45 h0.6 r180; Bottom Overlay "-" at 101.82,41.14 h0.6 r180
K5: Bottom Overlay "+" at 66.595,34.825 h0.6 r180; Bottom Overlay "-" at 66.445,29.515 h0.6 r180
K6: Bottom Overlay "-" at 84.32,29.515 h0.6 r180; Bottom Overlay "+" at 84.47,34.825 h0.6 r180
K7: Bottom Overlay "+" at 84.47,23.325 h0.6 r180; Bottom Overlay "-" at 84.32,18.015 h0.6 r180
K8: Bottom Overlay "+" at 84.279,46.323 h0.6 r180; Bottom Overlay "-" at 84.129,41.013 h0.6 r180
K9: Bottom Overlay "-" at 84.07,52.515 h0.6 r180; Bottom Overlay "+" at 84.22,57.825 h0.6 r180
K10: Bottom Overlay "+" at 102.095,23.325 h0.6 r180; Bottom Overlay "-" at 101.945,18.015 h0.6 r180
K11: Bottom Overlay "-" at 101.695,52.515 h0.6 r180; Bottom Overlay "+" at 101.845,57.825 h0.6 r180